# Altium PCB SamirAbiNahed-DigitalTasbeeh.PcbDoc (part 2 of 2)
Units mm, origin at the board's own origin, x right, y up, seen from the top; angles counter-clockwise.
Board outline 32 x 12.5 mm, 2 copper layers (Top Layer, Bottom Layer), stack 0.37 mm thick; 38 components, 34 nets, 117 pads, 35 vias.
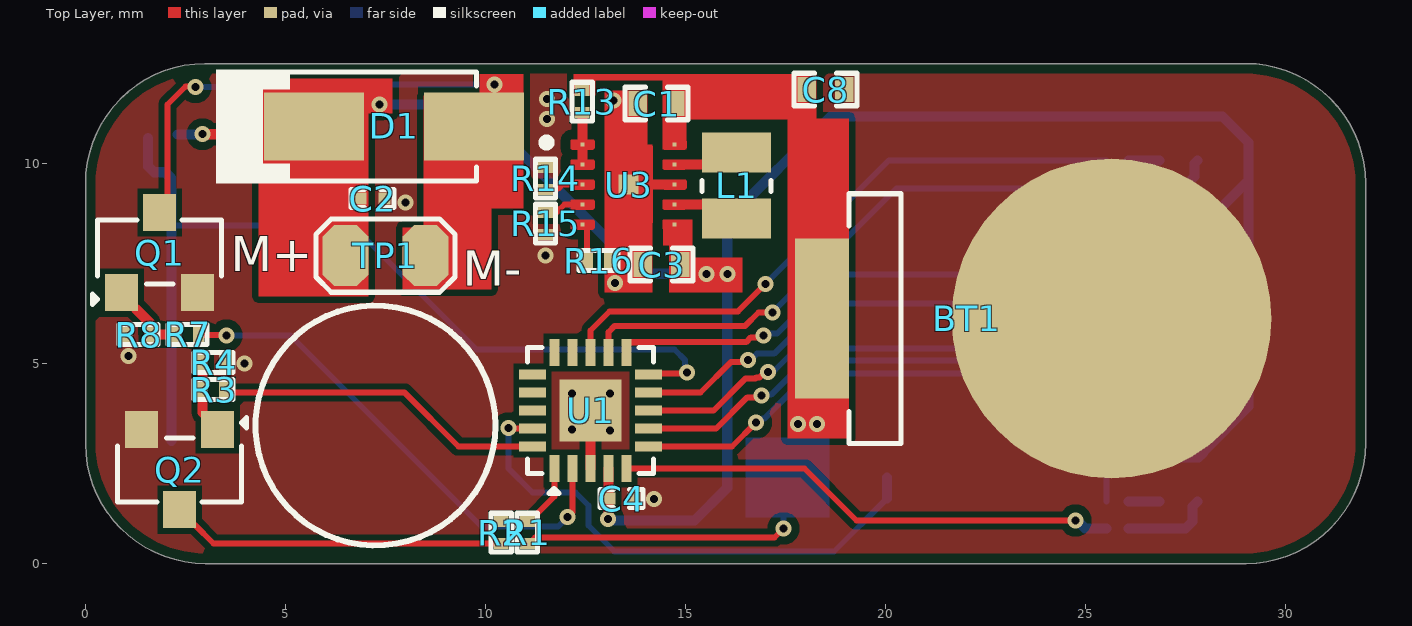
[diagram p0: Top Layer view]

## Other copper (continued)
Top Layer: (continued)
  rectangle net +3V_Out: 14.582,6.775 15.17,8.6
  rectangle net +3V_Out: 14.437,7.95 15.025,8.6
  rectangle net GND: 12.975,6.775 14.175,10.475
  rectangle net GND: 12.975,8.525 14.05,11.825
  rectangle net V_BAT: 12.2,11.705 12.75,12.242
  rectangle net V_BAT: 12.2,12.075 15.025,12.241
  rectangle net V_BAT: 14.425,10.35 15.025,12.224
  rectangle net V_BAT: 14.425,11.1 18.275,12.24
  rectangle net V_BAT: 17.75,10.575 18.275,12.175
  rectangle net V_BAT: 17.55,3.125 19.088,11.125
Bottom Layer:
  rectangle net V_BAT: 16.5,1.15 18.6,3.15
  rectangle net V_BAT: 17.575,1.15 18.6,3.725

## Silkscreen, mask and mechanical layers (free items; w line width, h text height)
Top Overlay:
  circle w0.152: c7.25,3.45 r3
  text "M+" at 3.634,7.013 h1.5
  text "M-" at 9.428,6.66 h1.5
Bottom Overlay:
  text "UPDI" at 21.768,4.854 h1.5
  text "GND" at 24.651,3.379 h1.5
  text "3V" at 16.413,1.554 h1.5

## Dimensions
32.6,12.5 to 29.013,0 on Top Overlay
0,9.5 to 32,13.425 on Top Overlay

## Text inside footprints (layer, text, board x,y; h text height)
D2: Bottom Overlay "+" at 28.325,2.539 h0.5 r270
D3: Bottom Overlay "+" at 28.325,5.381 h0.5 r270
D4: Bottom Overlay "+" at 28.325,8.222 h0.5 r270
D5: Bottom Overlay "+" at 28.325,11.064 h0.5 r270
U2: Mechanical 13 "*" at 5.359,3.608 h1.27 r270